# Altium PCB PWM_CONTROLLER_nverter_540VDC_V2.PcbDoc (part 2 of 2)
Units mm, origin at the board's own origin, x right, y up, seen from the top; angles counter-clockwise.
Board outline 210 x 60 mm, 2 copper layers (Top Layer, Bottom Layer), stack 2.071 mm thick; 245 components, 120 nets, 586 pads, 102 vias.
Unrouted connection lines stored in the file: 1.
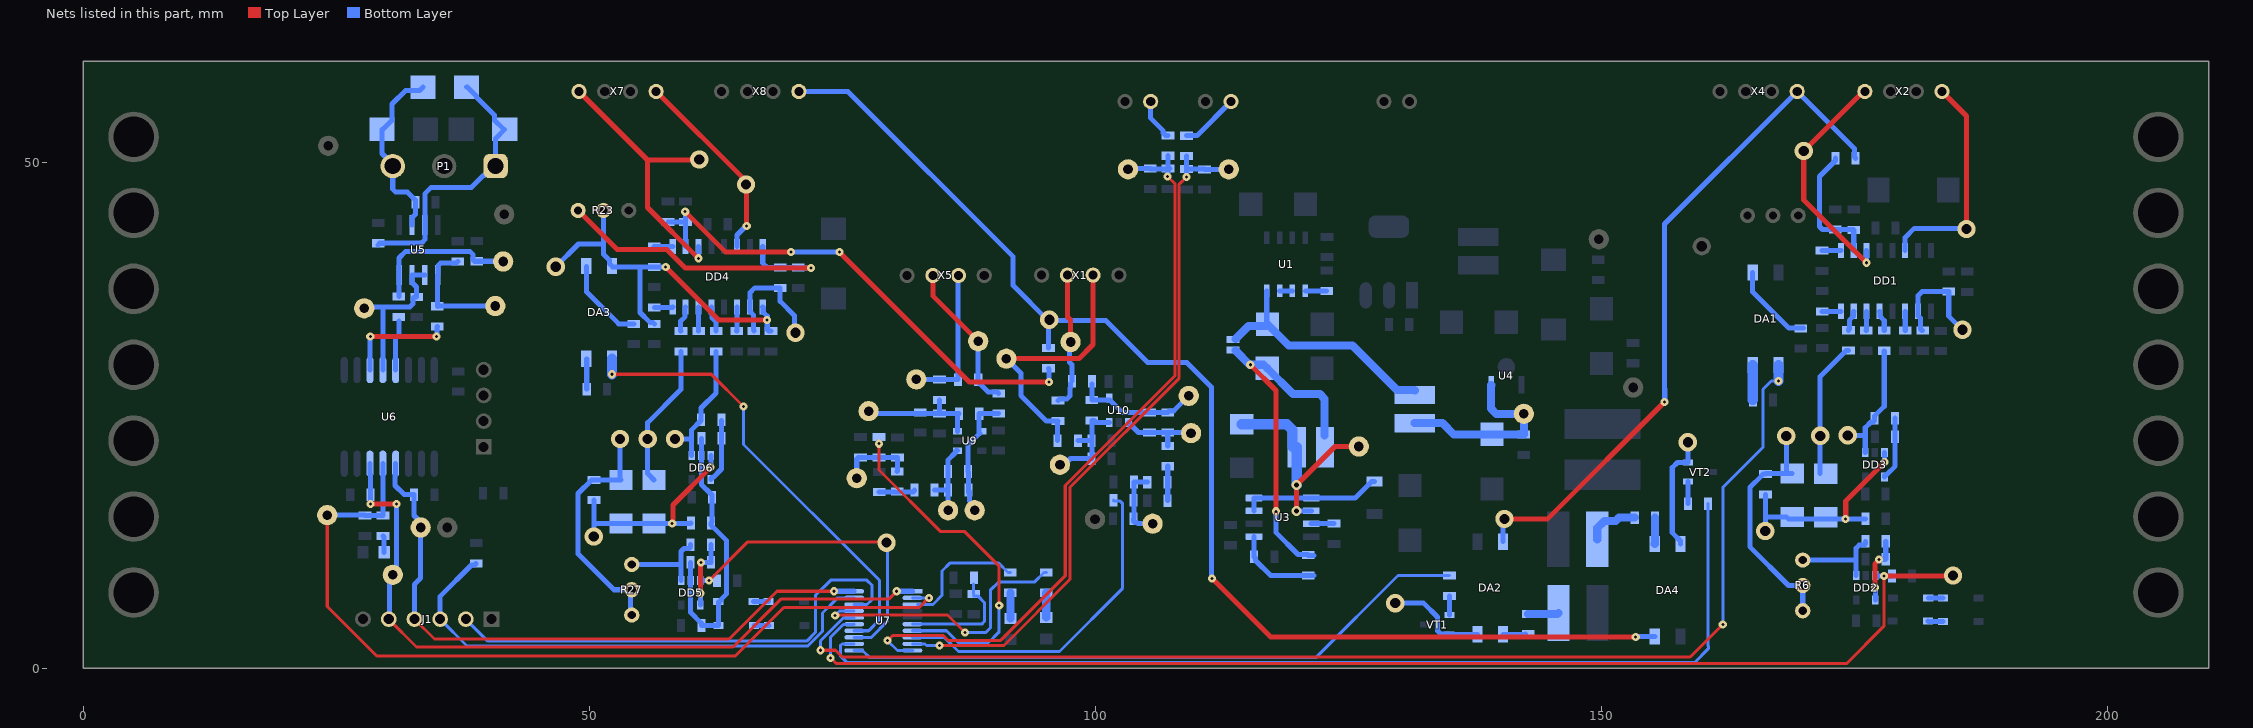
[diagram p2: the nets of this part, all layers, seen from the top]

## Via types
v1: diameter 0.8, hole 0.3, Top Layer to Bottom Layer, 73 vias
v2: diameter 1.8, hole 1, Top Layer to Bottom Layer, 22 vias
v3: diameter 0.7, hole 0.3, Top Layer to Bottom Layer, 4 vias
v4: diameter 1, hole 0.5, Top Layer to Bottom Layer, 3 vias

## Nets (pads, with @x,y where several pads share a name; then routed paths per layer and width w, separated by ;. In a path a pad name is that pad's centre, name@x,y a point inside that pad or via, vN(x,y) a via of type N, cw(c..) or ccw(c..) an arc to the next point about the centre after c; other vN are vias at no path point) (continued)
NetC8_1: C8.1 DD3.3 R10.2 TP9.1 VD1.2 VD2.2 | length 22.1
  Top Layer w0.5: v1(174.111,14.777) 174.124,14.79 174.124,16.553 v1(177.949,20.378)
  Bottom Layer w0.5: TP9.1@166.048,13.452 TP9.1@166.297,13.701 ; v2(166.173,13.576) 166.173,14.249 166.193,14.27 166.193,14.978 ; R10.2@166.193,17.203 166.193,14.978 ; C8.1@176.074,14.777 v1(174.111,14.777) 168.449,14.777 168.249,14.978 166.193,14.978 ; v1(177.949,20.378) DD3.3@177.949,21.328
NetC9_1: C9.1 DD1.8 | length 1.8
  Bottom Layer w0.5: C9.1@171.797,35.279 DD1.8@173.641,35.279
NetC10_2: C10.2 DD1.10 R15.1 R18.2 | length 12.9
  Bottom Layer w0.5: R15.1@173.1,50.4 173.1,50.175 171.525,48.6 171.525,43.646 171.818,43.354 C10.2@174.871,43.354 ; DD1.10@174.911,41.279 C10.2@174.911,43.313
NetC12_1: C12.1 C16.1 DA3.4 DD4.1 R23.2 R41.2 TP12.1 | length 38.2
  Top Layer w0.5: v1(57.559,39.666) 62.819,34.405 v1(67.555,34.405)
  Bottom Layer w0.5: v2(46.7,39.675) 48.953,41.928 51.409,41.928 ; R23.2@51.409,45.241 51.409,41.928 ; C12.1@56.434,34.041 56.284,34.191 55.984,34.191 55.009,35.166 55.009,39.668 ; v1(57.559,39.666) 57.556,39.668 R41.2@56.414,39.668 55.009,39.668 ; DD4.1@67.144,35.691 67.194,35.641 67.194,35.188 67.589,34.793 67.589,33.468 67.739,33.318 C16.1@67.964,33.318 ; 51.409,41.928 51.409,40.916 52.004,40.321 52.004,39.991 52.326,39.668 55.009,39.668
NetC13_1: C13.1 DD4.16 R23.3 R29.1 | length 32
  Top Layer w0.5: R23.3@48.909,45.241 52.759,41.391 57.659,41.391 59.509,39.541 v1(71.909,39.541)
  Bottom Layer w0.5: DD4.16@67.144,41.691 67.144,40.038 67.564,39.618 68.864,39.618 70.273,39.618 70.325,39.567 71.882,39.567 v1(71.909,39.541)
NetC14_1: C14.1 C15.1 C18.2 DD5.2 DD6.2 R34.2 R42.2 VD9.2 VD10.1 | length 28.3
  Bottom Layer w0.5: R34.2@60.025,10.475 DD5.2@60.025,8.675 60.025,5.525 61.075,4.475 C14.1@61.075,4.25 62.775,4.25 62.775,6.575 62.875,6.575 63,6.7 63,6.8 63.575,7.375 63.575,12.625 62.2,14 62.05,14.15 C18.2@62.05,14.375 62.125,14.45 C15.1@62.125,16.9 62.125,17.125 61.975,17.275 61.075,18.175 DD6.2@61.075,21.05 R42.2@61.075,22.725
NetC18_1: C18.1 DD6.3 R31.2 TP20.1 VD7.2 VD8.2 | length 21.6
  Top Layer w0.5: v1(58.2,14.325) 58.275,14.4 58.275,16.15 v1(62,19.875)
  Bottom Layer w0.5: v2(50.45,13.025) 50.475,13.05 R31.2@50.475,16.625 ; 50.475,14.425 50.575,14.325 v1(58.2,14.325) 60,14.325 C18.1@60.05,14.375 ; v1(62,19.875) 62,19.975 62.025,20 DD6.3@62.025,21.05
NetC19_1: C19.1 DD4.8 | length 1.8
  Bottom Layer w0.5: C19.1@56.439,35.668 58.232,35.668 DD4.8@58.254,35.691
NetC20_2: C20.2 DD4.10 R36.1 R39.2 | length 49.4
  Top Layer w0.5: v1(59.484,45.116) 63.449,41.15 v1(69.95,41.15) ; v1(74.725,41.125) 87.55,28.3 v1(95.425,28.3)
  Bottom Layer w0.5: R39.2@57.789,44.118 C20.2@59.514,44.118 ; v1(59.484,45.116) 59.499,45.101 59.499,44.133 C20.2@59.514,44.118 ; DD4.10@59.524,41.691 59.524,44.108 C20.2@59.514,44.118 ; v1(69.95,41.15) 74.7,41.15 v1(74.725,41.125) ; R36.1@95.375,29.65 95.425,29.6 v1(95.425,28.3)
NetC25_1: C25.1 U3.3 | length 2.2
  Bottom Layer w0.5: U3.3@121.325,14.3 C25.1@123.575,14.3
NetC26_1: C26.1 JE1.1 L4.1 U1.8 | length 24.4
  Bottom Layer w0.5: U1.8@116.925,37.3 116.925,34.075 C26.1@117,34
  Bottom Layer w0.8: JE1.1@113.835,32.533 115.119,33.817 116.817,33.817 C26.1@117,34 119.1,31.9 125.4,31.9 129.778,27.522 131.507,27.522 L4.1@131.579,27.45
NetC27_1: C27.1 C29.2 L4.2 TP25.1 U4.3 | length 19.1
  Bottom Layer w0.8: L4.2@131.525,24.228 134.297,24.228 135.4,23.125 C27.1@139.175,23.125 ; U4.3@139.1,28.019 139.075,27.994 139.075,25.675 139.6,25.15 TP25.1@142.325,25.15 C29.2@142.325,23.1 C27.1@139.175,23.1
NetC28_1: C28.1 JE1.2 L3.2 R52.1 | length 36.7
  Top Layer w0.5: v1(115.3,30) 117.85,27.45 117.85,15.55 v1(117.825,15.525)
  Bottom Layer w0.5: v1(117.825,15.525) 117.825,13.45 120.007,11.268 120.957,11.268 R52.1@121.025,11.2 ; R52.1@121.025,11.175 R52.1@121.6,11.175
  Bottom Layer w0.8: JE1.2@113.835,31.392 115.226,30 v1(115.3,30) 116.625,30 C28.1@116.975,29.65 119.525,27.1 122.181,27.1 122.65,26.631 L3.2@122.65,23.008
NetC34_2: C34.2 R58.2 U7.6 | length 11.4
  Bottom Layer w0.3: U7.6@81.925,4.375 88.775,4.375 89.05,4.65 89.05,6.5 88.475,7.075 88.475,7.1 88.425,7.15 C34.2@87.95,7.15 ; C34.2@87.975,7.35 87.975,8.325
NetC39_1: C39.1 C44.1 R66.2 R69.1 TP42.1 U9.4 | length 12.5
  Bottom Layer w0.5: C44.1@87.45,17.4 87.45,19.425 R69.1@87.425,19.45 87.425,22.075 88.575,23.225 88.525,23.275 C39.1@88.525,25.175 R66.2@90.45,25.175 ; C44.1@87.45,17.625 87.578,17.497 87.578,16.528 88.075,16.031 TP42.1@88.075,15.625
NetC39_2: C39.2 C43.2 R60.2 R68.2 TP37.1 U9.3 | length 12.2
  Bottom Layer w0.5: TP37.1@77.6,25.425 77.85,25.175 C39.2@86.525,25.175 86.375,25.025 U9.3@86.375,23.425 ; C43.2@84.6,25.2 R60.2@84.6,26.525
NetC40_1: C40.1 R66.1 TP41.1 X5.2 | length 14.5
  Top Layer w0.5: X5.2@83.945,38.825 83.945,36.805 TP41.1@88.425,32.325
  Bottom Layer w0.5: TP41.1@88.485,31.95 88.425,31.89 C40.1@88.425,28.525 88.425,28.3 89.4,27.325 90.3,27.325 R66.1@90.45,27.175
NetC40_2: C40.2 R60.1 TP36.1 X5.3 | length 14.4
  Bottom Layer w0.5: TP36.1@82.31,28.55 82.335,28.525 R60.1@84.6,28.525 C40.2@86.425,28.525 86.425,38.765 X5.3@86.485,38.825
NetC41_2: C41.2 R62.1 R63.2 | length 3.6
  Bottom Layer w0.5: C41.2@78.65,17.425 81.975,17.425 82.125,17.575 R62.1@82.125,17.625
NetC42_2: C42.2 R63.1 R64.2 R67.1 TP38.1 | length 7.4
  Bottom Layer w0.5: TP38.1@76.425,18.8 76.425,20.7 76.575,20.85 C42.2@76.8,20.85 R64.2@78.625,20.85 80.425,20.85 R67.1@80.45,20.825 80.45,19.5 R63.1@80.425,19.475
NetC44_2: C44.2 R62.2 R69.2 TP39.1 U9.1 | length 7.7
  Bottom Layer w0.5: R62.2@84.125,17.625 C44.2@85.45,17.625 ; TP39.1@85.45,15.625 C44.2@85.45,17.625 85.425,17.65 R69.2@85.425,19.45 85.425,20.575 86.175,21.325 86.175,21.45 86.25,21.525 U9.1@86.375,21.525
NetC46_1: C46.1 C53.1 R75.2 R84.1 TP51.1 U10.4 | length 12.3
  Bottom Layer w0.5: R75.2@99.65,28.075 C46.1@99.65,26.5 101.45,26.5 102.65,25.3 R84.1@105.35,25.3 C53.1@107.15,25.3 107.3,25.45 107.75,25.45 TP51.1@109.225,26.925
NetC46_2: C46.2 C51.2 R71.2 R81.2 TP45.1 U10.3 | length 10.3
  Bottom Layer w0.5: TP45.1@96.5,20.125 96.906,20.125 97.531,20.75 99.625,20.75 99.65,20.775 C51.2@99.65,22.5 ; R71.2@98.275,22.5 C51.2@99.65,22.5 ; U10.3@101.375,24.3 100.075,24.3 99.875,24.5 C46.2@99.65,24.5 C51.2@99.65,22.5
NetC47_1: C47.1 R75.1 TP50.1 X1.2 | length 13.4
  Top Layer w0.5: X1.2@97.25,38.835 97.25,34.725 97.535,34.44 TP50.1@97.535,32.05
  Bottom Layer w0.5: C47.1@96.3,26.45 96.45,26.6 97.175,26.6 97.5,26.925 97.5,27.707 97.525,27.732 R75.1@97.525,28.15 ; X1.2@97.235,38.85 X1.2@97.25,38.835 ; TP50.1@97.535,32.05 97.46,31.975 97.46,30.225 97.675,30.01 R75.1@97.675,28.375
NetC47_2: C47.2 R71.1 TP44.1 X1.3 | length 26.9
  Top Layer w0.5: TP44.1@91.21,30.6 98.375,30.6 99.775,32 X1.3@99.775,38.85
  Bottom Layer w0.5: TP44.1@91.21,30.6 92.65,29.16 92.65,26.95 95.15,24.45 C47.2@96.3,24.45 96.275,24.425 R71.1@96.275,22.5
NetC48_2: C48.2 R72.1 R73.2 | length 3.4
  Bottom Layer w0.5: C48.2@107.125,16.575 107.15,16.6 R72.1@107.15,19.975
NetC49_2: C49.2 R73.1 R74.2 R76.1 TP47.1 | length 7.2
  Bottom Layer w0.5: R73.1@105.125,18.4 105.1,18.425 R76.1@103.8,18.425 103.8,16.625 103.8,14.825 C49.2@103.75,14.775 103.75,14.55 103.9,14.4 104.093,14.4 104.193,14.3 TP47.1@105.65,14.3
NetC50_2: C50.2 R77.2 R82.2 TP46.1 U7.10 | length 73.9
  Top Layer w0.3: v1(79.475,2.75) 80,3.275 84.95,3.275 85.45,2.775 90.65,2.775 97.025,9.15 97.025,18.082 107.875,28.932 107.875,47.85 v1(107.125,48.6)
  Bottom Layer w0.3: v1(79.475,2.75) 80.45,1.775 U7.10@81.961,1.775
  Bottom Layer w0.5: TP46.1@103.225,49.3 103.3,49.375 C50.2@105.425,49.375 ; C50.2@105.425,49.35 R82.2@107.175,49.35 ; v1(107.125,48.6) 107.15,48.625 107.15,49.225 107.3,49.375 R82.2@107.35,49.375 ; R82.2@107.175,49.375 R77.2@107.175,50.65
NetC52_2: C52.2 R70.2 R83.2 TP43.1 U7.9 | length 69.1
  Top Layer w0.3: v1(84.6,2.275) 90.975,2.275 97.5,8.8 97.5,17.9 108.275,28.675 108.275,47.824 v1(109,48.549)
  Bottom Layer w0.3: U7.9@81.925,2.425 83.175,2.425 83.325,2.275 v1(84.6,2.275)
  Bottom Layer w0.5: v1(109,48.549) C52.2@109,49.325 C52.2@109,49.35 ; R70.2@109,50.625 C52.2@109,49.35 ; R83.2@110.775,49.3 TP43.1@113.175,49.3 ; R83.2@110.775,49.35 C52.2@109,49.35
NetC53_2: C53.2 R72.2 R84.2 TP48.1 U10.1 | length 8.1
  Bottom Layer w0.5: U10.1@103.275,24.3 103.275,24.175 103.35,24.1 103.475,24.1 104.27,23.305 105.344,23.305 R84.2@105.35,23.3 C53.2@107.15,23.3 ; R72.2@107.15,21.975 C53.2@107.15,23.3 ; TP48.1@109.3,23.85 109.3,23.843 108.757,23.3 C53.2@107.15,23.3
NetD2_1: D2.1 R54.1 | length 1.7
  Bottom Layer w0.5: R54.1@29.625,13.1 29.75,12.975 D2.1@29.75,11.475
NetD3_1: D3.1 R59.2 | length 2.5
  Bottom Layer w0.8: D3.1@95.15,5.025 R59.2@95.15,7.475
NetD4_1: D4.1 R65.2 | length 2.5
  Bottom Layer w0.8: R65.2@91.6,7.475 91.6,4.975 D4.1@91.625,4.95
NetDA1_2: DA1.2 R1.2 | length 3.5
  Bottom Layer w1: DA1.2@164.93,29.975 164.93,26.545 R1.2@164.95,26.525
NetDA1_3: DA1.3 R3.2 | length 8.4
  Bottom Layer w0.5: DA1.3@164.93,39.125 164.93,37.195 168.5,33.625 R3.2@169.95,33.625
NetDA2_1: DA2.1 R4.1 | length 2.2
  Bottom Layer w0.5: DA2.1@140.275,3.375 142.425,3.375 R4.1@142.475,3.425
NetDA2_2: DA2.2 TP2.1 VT1.2 | length 10.5
  Bottom Layer w0.5: TP2.1@129.394,6.45 132.425,6.45 133.8,5.075 133.8,3.718 134.093,3.425 134.925,3.425 VT1.2@134.975,3.375 ; VT1.2@134.897,3.375 DA2.2@137.735,3.375
  other v2: 129.625,6.45
NetDA3_2: DA3.2 R22.2 | length 3
  Bottom Layer w0.5: R22.2@49.759,27.591 DA3.2@49.759,30.546
NetDA3_3: DA3.3 R24.2 | length 8.5
  Bottom Layer w0.5: DA3.3@49.741,39.713 49.741,37.208 52.909,34.041 R24.2@54.434,34.041
NetDA4_1: DA4.1 R25.1 | length 2.6
  Bottom Layer w0.8: DA4.1@155.255,12.3 155.275,12.32 R25.1@155.275,14.9
NetDA4_2: DA4.2 TP13.1 VT2.2 | length 11.6
  Bottom Layer w0.5: DA4.2@157.795,12.3 157.795,12.6 156.981,13.414 156.981,19.825 157.506,20.35 VT2.2@158.525,20.35 v2(158.525,22.35)
NetDD1_2: DD1.2 R7.1 R8.2 TP8.1 | length 11.2
  Bottom Layer w0.5: R7.1@181.721,33.379 181.646,33.379 181.496,33.529 181.496,34.594 181.261,34.829 DD1.2@181.261,35.279 181.261,36.819 181.671,37.229 R8.2@184.296,37.229 184.296,34.804 v2(185.646,33.454)
NetDD1_3: DD1.3 R12.1 | length 1.9
  Bottom Layer w0.5: DD1.3@179.991,35.279 179.996,35.274 R12.1@179.996,33.379
NetDD1_5: DD1.5 R14.1 | length 2.1
  Bottom Layer w0.5: DD1.5@177.451,35.279 177.501,35.229 177.501,34.779 177.921,34.359 R14.1@177.921,33.379
NetDD1_6: DD1.6 R16.1 | length 1.9
  Bottom Layer w0.5: R16.1@176.146,33.379 176.181,33.414 DD1.6@176.181,35.279
NetDD1_7: DD1.7 R17.1 | length 2.1
  Bottom Layer w0.5: R17.1@174.396,33.404 174.396,33.479 174.471,33.554 174.471,34.388 174.861,34.779 174.861,35.229 DD1.7@174.911,35.279
NetDD1_9: DD1.9 R20.1 | length 1.9
  Bottom Layer w0.5: R20.1@171.771,41.279 DD1.9@173.641,41.279
NetDD2_1: DD2.1 R6.1 R11.1 | length 9.4
  Bottom Layer w0.5: R6.1@169.874,10.703 175.061,10.703 175.149,10.79 ; DD2.1@175.149,9.178 175.149,10.79 ; R11.1@176.074,12.552 176.074,12.327 175.924,12.177 175.442,12.177 175.149,11.884 175.149,10.79
NetDD2_4: DD2.4 R11.2 R13.1 | length 6.6
  Top Layer w0.5: v1(176.999,8.003) 176.999,10.332 177.4,10.733 v1(177.4,10.775)
  Bottom Layer w0.5: v1(176.999,8.003) 177.049,7.953 DD2.4@177.049,6.778 ; v1(177.4,10.775) 177.414,10.789 178.06,10.789 R13.1@178.074,10.803 R11.2@178.074,12.552
NetDD3_1: DD3.1 R14.2 R19.1 TP6.1 | length 12.5
  Bottom Layer w0.5: v2(174.324,23.028) 175.994,23.028 176.049,23.082 ; DD3.1@176.049,21.328 176.049,23.082 ; R19.1@176.974,24.503 176.824,24.353 176.618,24.353 176.049,23.783 176.049,23.082 ; R19.1@176.974,24.728 176.974,24.953 177.921,25.9 R14.2@177.921,31.379
NetDD3_4: DD3.4 R19.2 R21.1 | length 6.3
  Bottom Layer w0.5: DD3.4@177.949,18.928 177.949,19.053 178.024,19.128 178.149,19.128 178.999,19.978 R21.1@178.999,22.878 178.999,24.703 R19.2@178.974,24.728
NetDD4_2: DD4.2 R28.1 R29.2 TP19.1 | length 12.3
  Bottom Layer w0.5: R28.1@66.264,33.318 66.264,33.453 66.249,33.468 66.249,34.897 65.956,35.191 65.924,35.191 65.874,35.241 DD4.2@65.874,35.691 65.884,35.701 65.884,37.116 66.362,37.593 R29.2@68.864,37.593 68.864,36.261 70.284,34.841 70.284,33.248 TP19.1@70.439,33.093
  other v2: 70.366,33.166
NetDD4_3: DD4.3 R33.1 | length 2.4
  Bottom Layer w0.5: R33.1@64.564,33.318 64.604,33.358 DD4.3@64.604,35.691
NetDD4_5: DD4.5 R35.1 | length 2.6
  Bottom Layer w0.5: DD4.5@62.064,35.691 62.114,35.641 62.114,34.643 62.539,34.218 R35.1@62.539,33.318
NetDD4_6: DD4.6 R37.1 | length 2.4
  Bottom Layer w0.5: DD4.6@60.794,35.691 60.794,33.338 R37.1@60.814,33.318
NetDD4_7: DD4.7 R38.1 | length 2.6
  Bottom Layer w0.5: R38.1@59.064,33.318 59.039,33.343 59.039,34.318 59.474,34.753 59.474,35.641 DD4.7@59.524,35.691
NetDD4_9: DD4.9 R41.1 | length 1.8
  Bottom Layer w0.5: R41.1@56.414,41.668 58.232,41.668 DD4.9@58.254,41.691
NetDD5_1: DD5.1 R27.1 R32.1 | length 9.2
  Bottom Layer w0.5: R27.1@54.2,10.275 58.954,10.275 59.075,10.396 ; DD5.1@59.075,8.675 59.075,10.396 ; R32.1@60.025,12.225 60.025,12 59.875,11.85 59.368,11.85 59.075,11.557 59.075,10.396
NetDD5_4: DD5.4 R32.2 R34.1 | length 7
  Top Layer w0.5: v1(60.975,7.425) 60.975,10.425 v1@61.025,10.475
  Bottom Layer w0.5: DD5.4@60.975,6.275 v1(60.975,7.425) ; v1(61.025,10.475) R34.1@62.025,10.476 R32.2@62.025,12.225
NetDD6_1: DD6.1 R35.2 R40.1 TP17.1 | length 12.9
  Bottom Layer w0.5: v2(58.475,22.675) 60.064,22.675 60.125,22.614 ; DD6.1@60.125,21.05 60.125,22.614 ; R40.1@61.05,24.5 60.125,23.575 60.125,22.614 ; R40.1@61.05,24.575 61.05,25.725 62.539,27.214 R35.2@62.539,31.318
NetDD6_4: DD6.4 R40.2 R42.1 | length 6.4
  Bottom Layer w0.5: DD6.4@62.025,18.65 62.025,18.775 62.1,18.85 62.225,18.85 63.075,19.7 R42.1@63.075,22.725 63.075,24.475 R40.2@63.05,24.5
NetJ1_2: J1.2 U7.18 | length 49.2
  Bottom Layer w0.3: J1.2@37.815,4.875 39.99,2.7 71.475,2.7 72.375,3.6 72.375,7.25 73.85,8.725 77.425,8.725 77.925,8.225 77.925,6.8 77.45,6.325 U7.18@76.175,6.325
NetJ1_3: J1.3 R61.1 U7.19 | length 52.2
  Bottom Layer w0.3: J1.3@35.275,4.875 37.925,2.225 71.6,2.225 73.05,3.675 73.05,5.475 74.55,6.975 U7.19@76.175,6.975
  Bottom Layer w0.5: J1.3@35.275,4.875 35.275,7.125 38.375,10.225 38.675,10.225 R61.1@38.825,10.375
NetJ1_4: J1.4 R48.1 TP28.1 U6.4 U7.20 | length 62.9
  Top Layer w0.3: J1.4@32.735,4.875 34.71,2.9 63.825,2.9 68.55,7.625 v1(74.175,7.625)
  Bottom Layer w0.5: U6.4@30.885,20.225 30.847,20.187 30.847,19.095 30.825,19.074 30.825,18.075 31.725,17.175 R48.1@32.7,17.175 32.7,15.116 TP28.1@33.35,14.466 ; J1.4@32.735,4.875 32.735,8.31 33.35,8.925 TP28.1@33.35,13.925 ; v1(74.175,7.625) U7.20@76.175,7.625
NetJ1_5: J1.5 R45.1 TP31.1 U6.6 U7.1 | length 73.2
  Top Layer w0.3: J1.5@30.195,4.875 32.945,2.125 64.225,2.125 68.975,6.875 79.625,6.875 v1(80.375,7.625)
  Top Layer w0.5: v1(28.4,16.25) v1(30.975,16.25) ; TP31.1@30.588,9.237 TP31.1@30.6,9.25
  Bottom Layer w0.5: U6.6@28.345,20.225 28.345,19.221 28.4,19.166 R45.1@28.4,17.15 v1(28.4,16.25) ; J1.5@30.275,5.049 30.275,8.55 30.975,9.25 v1(30.975,16.25) ; v1(80.375,7.625) U7.1@81.925,7.625
NetL1_1: L1.1 R4.2 | length 3
  Bottom Layer w0.8: R4.2@142.75,5.375 145.65,5.375 L1.1@145.75,5.475
NetL2_1: L2.1 R25.2 | length 5.3
  Bottom Layer w0.8: L2.1@149.575,12.75 149.575,13.881 150.275,14.581 151.406,14.581 151.725,14.9 R25.2@153.275,14.9
NetL3_1: L3.1 TP24.1 U3.2 VD13.1 | length 22.5
  Top Layer w0.5: v4(119.875,15.55) 119.875,18.116 v4(119.866,18.125) 123.666,21.925 TP24.1@126.025,21.925
  Bottom Layer w0.5: v4(119.875,15.55) 119.895,15.57 U3.2@121.325,15.57
  Bottom Layer w1: VD13.1@114.45,24.125 118.9,24.125 119.486,23.539 L3.1@119.486,21.875 ; v4(119.866,18.125) 119.886,18.146 L3.1@119.886,21.875
NetP1_1: P1.1 R56.2 U5.7 ZD1.1 ZD3.2 | length 27.2
  Bottom Layer w0.5: R56.2@29.15,41.85 29.3,42 29.793,42 29.818,42.025 33.425,42.025 33.76,42.36 U5.7@33.76,43.815 33.76,46.885 34.4,47.525 38.375,47.525 39.56,48.71 39.651,48.71 P1.1@40.6,49.659 ; ZD1.1@37.875,57.425 37.975,57.425 38.875,56.525 38.875,56.425 40.65,54.65 40.65,54.15 41.55,53.25 ZD3.2@41.65,53.25 40.755,52.355 P1.1@40.755,49.625
NetP1_3: P1.3 R44.1 U5.6 ZD1.2 ZD2.2 | length 18.4
  Bottom Layer w0.5: U5.6@32.49,43.815 32.49,44.54 32.505,44.555 32.532,44.555 32.825,44.848 32.825,46.275 32.05,47.05 30.888,47.05 30.595,47.343 P1.3@30.595,49.625 30.595,49.798 29.525,50.868 ZD2.2@29.525,53.25 29.625,53.25 30.525,54.15 30.525,55.75 31.868,57.093 33.243,57.093 ZD1.2@33.575,57.425
NetR5_2: R5.2 VT1.1 | length 1.9
  Bottom Layer w0.5: VT1.1@134.975,5.275 R5.2@134.975,7.175
NetR6_2: R6.2 R6.3 R10.1 TP5.1 VD1.1 | length 23.6
  Bottom Layer w0.5: VD1.1@168.249,19.278 v2(168.249,22.953) ; VD1.1@168.824,19.253 168.249,19.253 166.243,19.253 R10.1@166.193,19.203 165.968,19.203 165.818,19.053 165.818,19.047 164.649,17.878 164.649,12.028 168.474,8.203 R6.2@169.874,8.203 R6.3@169.874,5.703
NetR17_2: R17.2 TP11.1 VD2.1 | length 13.5
  Bottom Layer w0.5: VD2.1@171.574,19.253 171.574,22.953 v2(171.599,22.978) 171.599,28.831 174.171,31.404 R17.2@174.396,31.404
NetR26_2: R26.2 VT2.1 | length 2.2
  Bottom Layer w0.5: R26.2@158.525,16.275 VT2.1@158.525,18.45
NetR27_2: R27.2 R27.3 R31.1 TP16.1 VD7.1 | length 24.1
  Bottom Layer w0.5: v2(53.05,22.675) 53.05,18.725 VD7.1@53.15,18.625 R31.1@50.475,18.625 50.25,18.625 48.9,17.275 48.9,11.325 52.45,7.775 R27.2@54.2,7.775 ; R27.3@54.1,5.05 R27.2@54.1,7.55
NetR38_2: R38.2 TP22.1 VD8.1 | length 14.3
  Bottom Layer w0.5: VD8.1@56.4,18.625 55.775,19.25 v2(55.775,22.675) 55.775,24.282 59.064,27.57 R38.2@59.064,31.318
NetR43_2: R43.2 U1.5 | length 2.1
  Bottom Layer w0.5: U1.5@120.735,37.3 R43.2@122.85,37.3
NetR46_1: R46.1 R50.1 TP26.1 U5.4 | length 15.1
  Bottom Layer w0.5: R50.1@31.2,36.725 31.2,38.14 31.22,38.16 31.22,40.545 31.875,41.2 38.207,41.2 38.5,40.907 38.5,40.375 38.65,40.225 41.475,40.225 TP26.1@41.5,40.2
NetR47_1: R47.1 R51.1 TP32.1 U5.1 | length 11.9
  Bottom Layer w0.5: R51.1@35,35.775 R51.1@35.025,35.8 ; R47.1@37.025,40.2 36.875,40.05 35.338,40.05 35.045,39.757 35.045,38.9 U5.1@35.03,38.885 35.03,35.805 R51.1@35.025,35.8 ; TP32.1@40.725,35.8 R51.1@35.025,35.8
NetR49_2: R49.2 U3.1 U3.7 U3.8 | length 13.8
  Bottom Layer w0.5: U3.7@115.675,15.57 U3.8@115.675,16.84 U3.1@121.325,16.84 125.665,16.84 127.275,18.45 R49.2@127.575,18.45
NetR50_2: R50.2 U6.13 | length 5
  Bottom Layer w0.5: U6.13@30.885,29.475 30.885,32.657 31.2,32.972 31.2,34.325
NetR51_2: R51.2 U6.11 | length 10.9
  Top Layer w0.5: v1(28.375,32.775) v1(34.925,32.775)
  Bottom Layer w0.5: U6.11@28.345,29.475 28.345,32.745 v1(28.375,32.775) ; v1(34.925,32.775) 34.962,32.812 34.962,33.738 R51.2@35,33.775
NetR52_2: R52.2 R57.2 U3.5 | length 8.8
  Bottom Layer w0.5: U3.5@115.675,13.03 R57.2@115.675,11.05 115.825,10.9 115.825,10.675 117.325,9.175 R52.2@121.6,9.175
NetR53_2: R53.2 TP30.1 U5.2 U5.3 U6.12 | length 15.9
  Bottom Layer w0.5: TP30.1@27.775,35.575 27.9,35.7 29.615,35.7 29.805,35.7 ; U6.12@29.615,29.475 29.615,35.51 29.805,35.7 ; U5.2@33.76,38.885 U5.3@32.49,38.885 32.505,38.87 32.505,38.12 32.95,37.675 R53.2@32.95,36.7 32.725,36.7 32.575,36.55 32.575,35.993 32.282,35.7 29.805,35.7
NetR54_2: R54.2 R55.2 TP27.1 U6.5 U7.2 | length 85.3
  Top Layer w0.3: TP27.1@24.125,15.15 24.125,6.125 29.025,1.225 64.425,1.225 69.225,6.025 82.6,6.025 v1(83.55,6.975)
  Bottom Layer w0.3: TP27.1@24.125,15.15 TP27.1@24.225,15.05 ; U7.2@81.925,6.975 v1(83.55,6.975)
  Bottom Layer w0.5: TP27.1@24.125,15.15 27.8,15.15 R55.2@27.85,15.1 R54.2@29.625,15.1 29.615,15.11 U6.5@29.615,20.225
NetR59_1: R59.1 U7.17 | length 28.3
  Top Layer w0.3: v1(74.3,5.25) 74.325,5.275 85.4,5.275 v1(87.125,3.55)
  Bottom Layer w0.3: v1(74.3,5.25) 74.726,5.675 U7.17@76.175,5.675 ; v1(87.125,3.55) 89.175,3.55 89.625,4 89.625,7.725 90.425,8.525 93.975,8.525 94.925,9.475 R59.1@95.15,9.475
NetR64_1: R64.1 U7.7 | length 34.5
  Top Layer w0.3: v1(78.625,22.2) 78.625,19.6 84.675,13.55 87.05,13.55 90.5,10.1 v1(90.5,6.225)
  Bottom Layer w0.3: U7.7@81.925,3.725 85.3,3.725 86.55,2.475 89.35,2.475 90.5,3.625 v1(90.5,6.225)
NetR65_1: R65.1 U7.3 | length 12.7
  Bottom Layer w0.3: U7.3@82.412,6.325 83.95,6.325 84.85,7.225 84.85,9.625 85.625,10.4 90.45,10.4 91.375,9.475 R65.1@91.6,9.475
NetR70_1: R70.1 X6.1 | length 5.8
  Bottom Layer w0.5: R70.1@109,52.625 109.025,52.65 110.05,52.65 X6.1@113.4,56
NetR74_1: R74.1 U7.8 | length 33.4
  Bottom Layer w0.3: U7.8@81.925,3.075 85.075,3.075 86.475,1.675 96.45,1.675 102.7,7.925 102.7,16.275 102.449,16.526 101.874,16.526 R74.1@101.775,16.625
NetR77_1: R77.1 X3.1 | length 4.2
  Bottom Layer w0.5: X3.1@105.465,56 105.465,54.36 106.7,53.125 106.7,52.9 106.95,52.65 R77.1@107.175,52.65
NetU1_6: U1.6 U1.7 | length 1.3
  Bottom Layer w0.5: U1.7@118.195,37.3 U1.6@119.465,37.3
NetVD3_1: VD3.1 VD5.2 | length 1.5
  Bottom Layer w0.5: VD3.1@182.249,4.678 182.274,4.653 VD5.2@183.724,4.653
NetVD4_2: VD4.2 VD6.1 | length 1.5
  Bottom Layer w0.5: VD4.2@182.274,6.953 VD6.1@183.724,6.953
NetVD9_1: VD9.1 VD11.2 | length 1.5
  Bottom Layer w0.5: VD9.1@66.25,6.6 VD11.2@67.725,6.6
NetVD10_2: VD10.2 VD12.1 | length 1.5
  Bottom Layer w0.5: VD10.2@66.283,4.256 VD12.1@67.758,4.256
OUT_A1: DD1.11 TP10.1 X2.4 | length 23.3
  Top Layer w0.5: X2.4@176.005,57 175.85,57 v2(169.975,51.125) 169.975,46.275 v1(176.175,40.075)
  Bottom Layer w0.5: v1(176.175,40.075) 176.178,40.078 176.178,41.275 DD1.11@176.181,41.279
OUT_A2: DD4.11 TP21.1 X7.4 | length 27.7
  Top Layer w0.5: X7.4@48.995,57 55.759,50.236 ; v1(60.784,40.516) 55.759,45.541 55.759,50.236 ; TP21.1@60.875,50.236 55.759,50.236
  Bottom Layer w0.5: v1(60.784,40.516) 60.789,40.521 60.789,41.686 DD4.11@60.794,41.691
  other v2: 60.875,50.275
OUT_B1: DD1.14 TP7.1 X2.1 | length 22.5
  Top Layer w0.5: X2.1@183.625,57 186.05,54.575 v2(186.05,43.4)
  Bottom Layer w0.5: DD1.14@179.991,41.279 179.991,42.566 180.9,43.475 185.675,43.475 TP7.1@186.075,43.075
OUT_B2: DD4.14 TP18.1 X7.1 | length 19.4
  Top Layer w0.5: X7.1@56.615,57 65.5,48.115 v2(65.5,47.8) 65.559,47.741 v1(65.559,43.716)
  Bottom Layer w0.5: DD4.14@64.604,41.691 64.604,42.823 65.497,43.716 v1(65.559,43.716)
PWM_1: DD2.3 R9.2 TP4.1 U7.15 | length 124.3
  Top Layer w0.3: v1(73.85,1.025) 73.885,1.025 74.435,0.475 174.2,0.475 177.886,4.161 v1(177.886,9.128)
  Top Layer w0.5: v1(177.886,9.128) TP4.1@184.878,9.128
  Bottom Layer w0.3: v1(73.85,1.025) 73.85,3.1 75.102,4.352 76.151,4.352 U7.15@76.175,4.375
  Bottom Layer w0.5: DD2.3@177.049,9.178 177.099,9.128 v1(177.886,9.128) R9.2@178.674,9.128
  other v2: 184.725,9.175
PWM_2: DD5.3 R30.2 TP15.1 U7.13 | length 31.4
  Top Layer w0.3: v1(61.825,8.675) 65.625,12.475 TP15.1@78.575,12.475
  Bottom Layer w0.3: U7.13@76.175,3.075 77.875,3.075 79.45,4.65 79.45,12.35 v2(79.375,12.425) ; TP15.1@79.375,12.264 v2(79.375,12.425) ; TP15.1@79.455,12.345 79.525,12.275 v2(79.375,12.425)
  Bottom Layer w0.5: DD5.3@60.975,8.675 v1(61.825,8.675)
PWM_SET_1: DA1.1 U7.16 | length 124.3
  Top Layer w0.3: v1(72.85,1.8) 74.325,1.8 75,1.125 158.75,1.125 v1(161.975,4.35)
  Bottom Layer w0.3: v1(72.85,1.8) 72.85,2.725 75.127,5.002 76.151,5.002 U7.16@76.175,5.025 ; v1(161.975,4.35) 161.975,17.875 165.95,21.85 165.95,27.575 166.775,28.4 v1(167.475,28.4)
  Bottom Layer w1: v1(167.475,28.4) DA1.1@167.475,29.97
PWM_SET_2: DA3.1 U7.14 | length 45.4
  Top Layer w0.3: v1(52.254,29.061) 62.064,29.061 v1(65.25,25.875)
  Bottom Layer w0.3: v1(65.25,25.875) 65.25,22.125 78.675,8.7 78.675,4.8 77.6,3.725 U7.14@76.175,3.725
  Bottom Layer w1: v1(52.254,29.061) DA3.1@52.254,30.591
SD_1: R5.1 U7.11 | length 62.4
  Bottom Layer w0.3: U7.11@76.175,1.775 76.974,1.775 77.035,1.715 77.65,1.1 121.825,1.1 129.9,9.175 R5.1@134.975,9.175
SD_2: R26.1 U7.12 | length 103.4
  Bottom Layer w0.3: U7.12@76.175,2.425 74.976,2.425 74.8,2.249 74.8,1.25 75.475,0.575 159.175,0.575 160.551,1.951 160.551,2.199 160.525,2.225 R26.1@160.525,16.275
SD_G_1: DA2.4 R15.2 TP52.1 X4.1 | length 68
  Top Layer w0.5: v2(140.4,14.775) 144.675,14.775 v1(156.225,26.325)
  Bottom Layer w0.5: DA2.4@140.275,12.525 140.275,14.65 v2(140.4,14.775) ; v1(156.225,26.325) 156.243,26.343 156.243,27.62 156.225,27.637 156.225,43.9 X4.1@169.325,57 174.97,51.355 174.97,50.53 R15.2@175.1,50.4
SD_G_2: DA4.4 R36.2 TP53.1 X8.1 | length 122.8
  Top Layer w0.5: v1(111.525,8.9) 117.3,3.125 v1(153.375,3.125)
  Bottom Layer w0.5: X8.1@70.705,57 75.55,57 91.875,40.675 91.875,37.825 95.355,34.345 95.355,31.67 R36.2@95.375,31.65 ; TP53.1@95.246,34.246 95.375,34.375 101.025,34.375 105.175,30.225 109.025,30.225 111.475,27.775 111.475,8.95 v1(111.525,8.9) ; TP53.1@95.84,34.548 TP53.1@95.84,34.9 ; v1(153.375,3.125) 153.4,3.15 DA4.4@155.255,3.15
  other v2: 95.45,34.45
pads on no net: DD1.4 DD4.4 U6.3 U6.14 X4.4

## Polygon pours and split planes (outlines as drawn)
GND_III on Bottom Layer "NONET_L-01_P-001" (solid, pour order 6): 22.65,0 22.65,22.1 35.125,22.1 38.225,25.2 44.5,25.2 45.267,25.967 45.267,60.002 188.675,60.002 188.675,0
GND_2 on Bottom Layer "NONET_L-01_P-001" (solid, pour order 1): 43.2,26.25 22.7,26.25 22.7,60.002 43.2,60.002
GND_III on Top Layer "NONET_L-01_P-001" (solid, pour order 5): 22.7,0 22.7,22.1 35.15,22.1 38.25,25.2 44.525,25.2 45.292,25.967 45.292,60.002 188.7,60.002 188.7,0
GND_2 on Top Layer "NONET_L-01_P-001" (solid, pour order 4): 43.2,26.25 22.7,26.25 22.7,60.002 43.2,60.002

## Keep-outs
Keep-Out Layer:
  the board outline again, w0.254

## Other copper
Top Layer:
  rectangle: 195.359,0.775 209.675,59.674
  rectangle: 0.359,0.675 14.675,59.574
Bottom Layer:
  rectangle: 195.359,0.775 209.675,59.674
  rectangle: 0.359,0.675 14.675,59.574

## Silkscreen, mask and mechanical layers (free items; w line width, h text height)
Top Overlay:
  text "B" at 44.771,59.321 h1.5 r180
  text "A" at 26.379,59.296 h1.5 r180
  text "I1" at 119.125,55.775 h1 r90
  text "I2" at 99.45,55.3 h1 r90
  text "+24V" at 135.225,54.75 h1 r90
  text "GND" at 117.446,54.504 h1 r90
  text "GND" at 125.321,54.504 h1 r90
  text "GND" at 97.596,54.079 h1 r90
  text "1B" at 184.121,53.904 h1 r90
  text "1A" at 176.371,53.804 h1 r90
  text "2B" at 57.121,53.604 h1 r90
  text "2A" at 49.571,53.479 h1 r90
  text "SD1" at 169.696,52.979 h1 r90
  text "GND" at 181.646,52.804 h1 r90
  text "GND" at 178.946,52.779 h1 r90
  text "SD2" at 71.013,52.646 h1 r90
  text "+5V" at 167.296,52.629 h1 r90
  text "+5V" at 68.596,52.579 h1 r90
  text "GND" at 162.196,52.554 h1 r90
  text "GND" at 52.071,52.529 h1 r90
  text "GND" at 54.621,52.529 h1 r90
  text "GND" at 63.521,52.504 h1 r90
  text "GND" at 111.398,51.756 h1 r90
  text "+24V" at 66.146,51.679 h1 r90
  text "+24V" at 164.721,51.504 h1 r90
  text "TP10" at 165.475,50.7 h0.8
  text "TP21" at 56.425,50.325 h0.8
  text "TP43" at 114.525,49.405 h0.8
  text "TP33" at 23.175,48.85 h0.8
  text "TP46" at 98.65,48.775 h0.8
  text "TP18" at 67.3,47.45 h0.8
  text "TP23" at 43.075,44.675 h0.8
  text "TP34" at 148.4,43.95 h0.8
  text "+5" at 89.625,43.8 h0.8 r90
  text "P1" at 86.925,43.5 h0.8 r90
  text "P2" at 97.854,43.517 h0.8 r90
  text "N2" at 100.254,43.517 h0.8 r90
  text "+5" at 102.804,43.517 h0.8 r90
  text "GND" at 81.5,43.475 h0.8 r90
  text "N1" at 84.175,43.425 h0.8 r90
  text "GND" at 95.025,43.3 h0.8 r90
  text "TP1" at 159.025,43.275 h0.8
  text "TP7" at 185.1,40.825 h0.8
  text "TP26" at 37.05,39.875 h0.8
  text "TP12" at 48.15,39.475 h0.8
  text "TP32" at 42.15,35.5 h0.8
  text "TP30" at 29.75,35.075 h0.8
  text "TP53" at 91,34.15 h0.8
  text "TP41" at 84.275,32.1 h0.8
  text "TP8" at 184.575,31.175 h0.8
  text "TP19" at 69.975,30.8 h0.8
  text "TP36" at 80.475,30.15 h0.8
  text "TP50" at 96.2,29.75 h0.8
  text "TP49" at 151.625,29.2 h0.8
  text "TP44" at 89.875,28.325 h0.8
  text "TP51" at 110.825,26.35 h0.8
  text "TP37" at 73.2,25.075 h0.8
  text "TP25" at 144.15,25.025 h0.8
  text "TP17" at 59.025,24.525 h0.8 r90
  text "TP16" at 53.375,24.5 h0.8 r90
  text "TP22" at 56.35,24.4 h0.8 r90
  text "TP24" at 124.875,23.35 h0.8
  text "TP48" at 111,22.975 h0.8
  text "TP13" at 160.325,22.125 h0.8
  text "TP45" at 92.075,19.675 h0.8
  text "TP38" at 72.025,18.45 h0.8
  text "TP35" at 36.625,16.1 h0.8 r90
  text "TP28" at 33.7,15.775 h0.8 r90
  text "TP24" at 89.55,15.375 h0.8
  text "TP39" at 81.025,15.25 h0.8
  text "TP52" at 135.95,14.4 h0.8
  text "TP47" at 107.4,13.8 h0.8
  text "TP9" at 162.7,13.425 h0.8
  text "TP27" at 23.25,12.725 h0.8
  text "TP20" at 45.975,12.725 h0.8
  text "TP15" at 74.95,11.875 h0.8
  text "TP4" at 183.775,10.9 h0.8
  text "TP31" at 26.5,8.875 h0.8
  text "TP2" at 125.875,6.1 h0.8
  text "CLK" at 35.7,3.525 h0.8 r90
  text "DIO" at 38.2,3.5 h0.8 r90
  text "3V3" at 40.85,3.5 h0.8 r90
  text "GND" at 28.1,3.375 h0.8 r90
  text "TX" at 33.075,3.325 h0.8 r90
  text "RX" at 30.55,3.275 h0.8 r90
Bottom Overlay:
  lines w1: 20,0.625 20,59.35 ; 190,0.65 190,59.35
  text "A" at 26.354,59.296 h1.5 r180
  text "B" at 43.854,59.246 h1.5 r180
  text "+24V" at 76.771,58.771 h1 r90
  text "+5V" at 78.521,58.771 h1 r90
  text "SD2" at 80.346,58.771 h1 r90
  text "GND" at 74.971,58.521 h1 r90
  text "+24V" at 135.09,58.426 h1 r90
  text "+24V" at 154.746,58.421 h1 r90
  text "+5V" at 156.446,58.321 h1 r90
  text "1A" at 191.946,58.321 h1 r90
  text "GND" at 193.821,58.321 h1 r90
  text "1B" at 197.321,58.271 h1 r90
  text "GND" at 195.521,58.246 h1 r90
  text "GND" at 13.871,58.146 h1 r90
  text "GND" at 15.846,58.096 h1 r90
  text "GND" at 152.921,58.096 h1 r90
  text "SD1" at 158.236,58.059 h1 r90
  text "2B" at 18.046,57.971 h1 r90
  text "2A" at 11.721,57.921 h1 r90
  text "GND" at 125.407,57.208 h1 r90
  text "GND" at 117.571,57.071 h1 r90
  text "I1" at 119.2,56.925 h1 r90
  text "GND" at 97.596,56.721 h1 r90
  text "I2" at 99.425,56.725 h1 r90
  text "GND" at 95.075,45.525 h0.8 r90
  text "GND" at 81.575,45.325 h0.8 r90
  text "+5" at 89.8,44.75 h0.8 r90
  text "P2" at 97.75,44.75 h0.8 r90
  text "N2" at 100.15,44.75 h0.8 r90
  text "+5" at 102.7,44.75 h0.8 r90
  text "P1" at 87.1,44.45 h0.8 r90
  text "N1" at 84.35,44.375 h0.8 r90
  text "GND" at 10.575,4.775 h0.8 r90
  text "3V3" at 18.45,4.775 h0.8 r90
  text "RX" at 12.175,4.75 h0.8 r90
  text "TX" at 13.775,4.75 h0.8 r90
  text "CLK" at 15.325,4.75 h0.8 r90
  text "DIO" at 16.9,4.725 h0.8 r90